# Altium PCB MainBoardPCB_4.PcbDoc (part 5 of 32)
Units mm, origin at the board's own origin, x right, y up, seen from the top; angles counter-clockwise.
Board outline 333.63 x 349.38 mm, 16 copper layers (L1, L2 (GND), L3 (Sign), L4 (GND), L5 (Sign), L6 (PWR/GND), L7(PWR/GND), L8 (Plane_GND), L9 (PWR/GND), L10 (PWR/GND), L11 (PWR/GND), L12 (Sign), L13 (GND), L14 (Sign), L15 (GND), L16), stack 2.502 mm thick; 2205 components, 1648 nets, 8314 pads, 3172 vias.
Unrouted connection lines stored in the file: 5141.
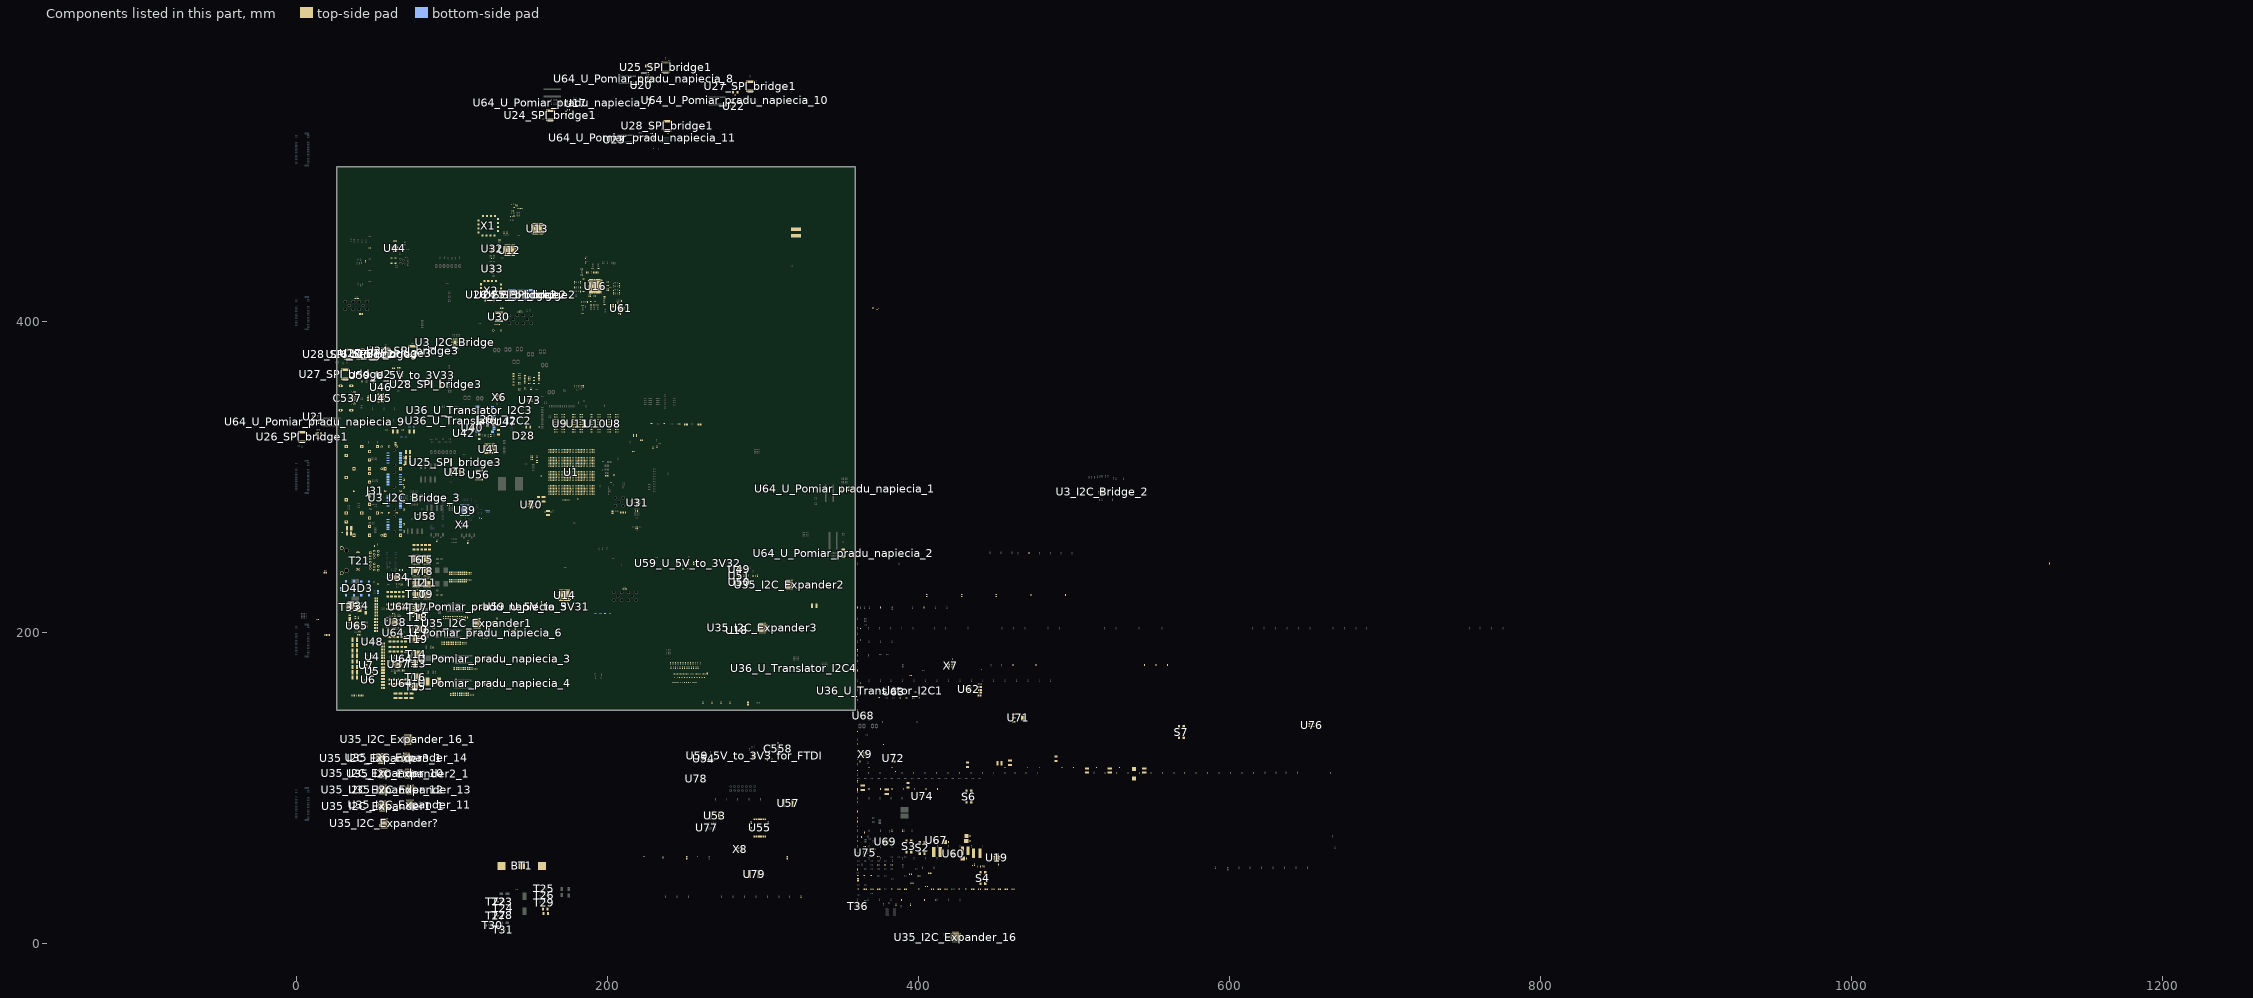
[diagram p17: the components of this part, seen from the top]

## Components (designator, comment, footprint, x,y, rotation, side; value= is the part's Value field where it differs from the comment) (continued)
T5 "BSC080N03LSG" BSC080N03LS 83.977,246.623 r90 top
T6 "BSC080N03LSG" BSC080N03LS 76.977,246.623 r90 top locked
T7 "BSC030N03LS-G" BSC030N03LS 76.977,239.389 r90 top
T8 "BSC030N03LS-G" BSC030N03LS 83.977,239.389 r90 top
T9 "BSC080N03LSG" BSC080N03LS 83.977,224.601 r270 top
T10 "BSC080N03LSG" BSC080N03LS 76.983,224.601 r270 top
T11 "BSC030N03LS-G" BSC030N03LS 83.977,231.864 r270 top
T12 "BSC030N03LS-G" BSC030N03LS 76.977,231.864 r270 top
T13 "BSC080N03LSG" BSC080N03LS 77.142,179.908 r180 top
T14 "BSC030N03LS-G" BSC030N03LS 77.114,186.055 r0 top
T15 "BSC080N03LSG" BSC080N03LS 76.889,165.106 r180 top
T16 "BSC030N03LS-G" BSC030N03LS 76.91,171.285 r0 top
T17 "BSC080N03LSG" BSC080N03LS 78.098,215.984 r180 top
T18 "BSC030N03LS-G" BSC030N03LS 78.073,209.702 r0 top
T19 "BSC080N03LSG" BSC080N03LS 78.029,195.651 r180 top
T20 "BSC030N03LS-G" BSC030N03LS 77.974,202.057 r0 top
T21 "7499511440" 7499511440 37.922,246.126 r90 bottom
T22 "IRLML6401TRPBF" IRLML6401PbF 128.638,26.733 r0 top
T23 "IRLML6401TRPBF" IRLML6401PbF 132.715,26.81 r0 top
T24 "SI2342DS-T1-GE3" SI2342DS-T1-GE3 132.905,22.581 r0 top
T25 "SI2342DS-T1-GE3" SI2342DS-T1-GE3 159.55,35.065 r0 top
T26 "SI2342DS-T1-GE3" SI2342DS-T1-GE3 159.461,30.836 r0 top
T27 "IRLML6401TRPBF" IRLML6401PbF 128.524,17.818 r0 top
T28 "SI2342DS-T1-GE3" SI2342DS-T1-GE3 132.601,18.212 r0 top
T29 "SI2342DS-T1-GE3" SI2342DS-T1-GE3 159.55,26.2 r0 top
T30 "IRLML6401TRPBF" IRLML6401PbF 126.263,11.532 r0 top
T31 "SI2342DS-T1-GE3" SI2342DS-T1-GE3 133.096,8.801 r0 top
T34 "RJK0651DPB-00#J5" RJK0651DPB 40.282,216.141 r270 top
T35 "SIJ482DP-T1-GE3" SiJ482DP 34.455,216.179 r90 top
T36 "SI2342DS-T1-GE3" SI2342DS-T1-GE3 361.423,24.028 r0 top
TP1_I2C_Bridge "TestPoint" TestPoint 766.635,73.393 r90 top (schematic designator TP1)
TP1_I2C_Bridge_2 "TestPoint" TestPoint 1231.379,242.418 r90 top (schematic designator TP1)
TP1_I2C_Bridge_3 "TestPoint" TestPoint 775.271,83.629 r90 top (schematic designator TP1)
TP2_I2C_Bridge "TestPoint" TestPoint 743.534,73.393 r90 top (schematic designator TP2)
TP2_I2C_Bridge_2 "TestPoint" TestPoint 1206.233,242.418 r90 top (schematic designator TP2)
TP2_I2C_Bridge_3 "TestPoint" TestPoint 751.662,83.629 r90 top (schematic designator TP2)
TP3_I2C_Bridge "TestPoint" TestPoint 720.42,73.393 r90 top (schematic designator TP3)
TP3_I2C_Bridge_2 "TestPoint" TestPoint 1181.1,242.418 r90 top (schematic designator TP3)
TP3_I2C_Bridge_3 "TestPoint" TestPoint 728.04,83.629 r90 top (schematic designator TP3)
TP4_I2C_Bridge "TestPoint" TestPoint 697.319,73.393 r90 top (schematic designator TP4)
TP4_I2C_Bridge_2 "TestPoint" TestPoint 1155.967,242.418 r90 top (schematic designator TP4)
TP4_I2C_Bridge_3 "TestPoint" TestPoint 704.418,83.629 r90 top (schematic designator TP4)
TP5_I2C_Bridge "TestPoint" TestPoint 674.205,73.393 r90 top (schematic designator TP5)
TP5_I2C_Bridge_2 "TestPoint" TestPoint 1104.151,242.418 r90 top (schematic designator TP5)
TP5_I2C_Bridge_3 "TestPoint" TestPoint 680.809,83.629 r90 top (schematic designator TP5)
TP6_I2C_Bridge "TestPoint" TestPoint 651.104,73.393 r90 top (schematic designator TP6)
TP6_I2C_Bridge_2 "TestPoint" TestPoint 1079.017,242.418 r90 top (schematic designator TP6)
TP6_I2C_Bridge_3 "TestPoint" TestPoint 657.187,83.629 r90 top (schematic designator TP6)
TP7_I2C_Bridge_2 "TestPoint" TestPoint 898.22,242.418 r90 top (schematic designator TP7)
TP8_I2C_Bridge "TestPoint" TestPoint 627.99,73.393 r90 top (schematic designator TP8)
TP8_I2C_Bridge_2 "TestPoint" TestPoint 1053.871,242.418 r90 top (schematic designator TP8)
TP8_I2C_Bridge_3 "TestPoint" TestPoint 633.578,83.629 r90 top (schematic designator TP8)
TP9_I2C_Bridge "TestPoint" TestPoint 604.888,73.393 r90 top (schematic designator TP9)
TP9_I2C_Bridge_2 "TestPoint" TestPoint 1028.738,242.418 r90 top (schematic designator TP9)
TP9_I2C_Bridge_3 "TestPoint" TestPoint 609.956,83.629 r90 top (schematic designator TP9)
TP10_I2C_Bridge "TestPoint" TestPoint 580.504,73.393 r90 top (schematic designator TP10)
TP10_I2C_Bridge_2 "TestPoint" TestPoint 1002.322,242.418 r90 top (schematic designator TP10)
TP10_I2C_Bridge_3 "TestPoint" TestPoint 585.076,83.629 r90 top (schematic designator TP10)
TP11_I2C_Bridge "TestPoint" TestPoint 556.387,73.393 r90 top (schematic designator TP11)
TP11_I2C_Bridge_2 "TestPoint" TestPoint 976.173,242.418 r90 top (schematic designator TP11)
TP11_I2C_Bridge_3 "TestPoint" TestPoint 560.438,83.629 r90 top (schematic designator TP11)
TP12_I2C_Bridge_2 "TestPoint" TestPoint 949.769,242.418 r90 top (schematic designator TP12)
TP13_I2C_Bridge_2 "TestPoint" TestPoint 923.353,242.418 r90 top (schematic designator TP13)
TP14_I2C_Bridge_2 "TestPoint" TestPoint 871.804,242.418 r90 top (schematic designator TP14)
TP15_I2C_Bridge "TestPoint" TestPoint 387.007,232.181 r90 top (schematic designator TP15)
TP15_I2C_Bridge_2 "TestPoint" TestPoint 845.401,242.418 r90 top (schematic designator TP15)
TP15_I2C_Bridge_3 "TestPoint" TestPoint 362.636,74.905 r90 top (schematic designator TP15)
TP16_I2C_Bridge "TestPoint" TestPoint 362.636,232.181 r90 top (schematic designator TP16)
TP16_I2C_Bridge_2 "TestPoint" TestPoint 818.985,242.418 r90 top (schematic designator TP16)
TP16_I2C_Bridge_3 "TestPoint" TestPoint 521.818,103.632 r90 top (schematic designator TP16)
TP17_I2C_Bridge "TestPoint" TestPoint 387.007,64.668 r90 top (schematic designator TP17)
TP17_I2C_Bridge_2 "TestPoint" TestPoint 792.582,242.418 r90 top (schematic designator TP17)
TP17_I2C_Bridge_3 "TestPoint" TestPoint 500.431,105.664 r90 top (schematic designator TP17)
TP18_I2C_Bridge "TestPoint" TestPoint 379.324,59.372 r90 top (schematic designator TP18)
TP18_I2C_Bridge_2 "TestPoint" TestPoint 766.166,242.418 r90 top (schematic designator TP18)
TP18_I2C_Bridge_3 "TestPoint" TestPoint 506.4,116.599 r90 top (schematic designator TP18)
TP19 "TestPoint" TestPoint 371.297,22.606 r0 top
TP20 "TestPoint" TestPoint 365.925,19.431 r0 top
TP33 "TestPoint" TestPoint 441.947,64.834 r0 top
TP34 "TestPoint" TestPoint 661.441,201.346 r0 top
TP35 "TestPoint" TestPoint 609.879,201.346 r0 top
TP36 "TestPoint" TestPoint 551.447,201.346 r0 top
TP37 "TestPoint" TestPoint 536.715,201.346 r0 top
TP38 "TestPoint" TestPoint 478.282,201.346 r0 top
TP39 "TestPoint" TestPoint 448.818,201.346 r0 top
TP40 "TestPoint" TestPoint 441.452,201.346 r0 top
TP41 "TestPoint" TestPoint 427.152,201.346 r0 top
TP42 "TestPoint" TestPoint 405.308,201.346 r0 top
TP43 "TestPoint" TestPoint 436.791,192.621 r0 top
TP44 "TestPoint" TestPoint 429.425,192.621 r0 top
TP45 "TestPoint" TestPoint 422.059,192.621 r0 top
TP46 "TestPoint" TestPoint 414.706,192.621 r0 top
TP47 "TestPoint" TestPoint 407.34,192.621 r0 top
TP48 "TestPoint" TestPoint 399.974,192.621 r0 top
TP49 "TestPoint" TestPoint 392.608,192.621 r0 top
TP50_SPI_bridge2 "TestPoint" TestPoint 239.789,400.736 r0 top (schematic designator TP50)
TP50_SPI_bridge3 "TestPoint" TestPoint 513.207,104.102 r90 top (schematic designator TP50)
TP51_SPI_bridge2 "TestPoint" TestPoint 235.217,390.855 r0 top (schematic designator TP51)
TP51_SPI_bridge3 "TestPoint" TestPoint 488.328,104.102 r90 top (schematic designator TP51)
TP52_SPI_bridge2 "TestPoint" TestPoint 240.805,395.199 r0 top (schematic designator TP52)
TP52_SPI_bridge3 "TestPoint" TestPoint 463.182,104.102 r90 top (schematic designator TP52)
TP53_SPI_bridge1 "TestPoint" TestPoint 436.524,351.409 r90 top (schematic designator TP53)
TP53_SPI_bridge2 "TestPoint" TestPoint 231.318,402.933 r0 top (schematic designator TP53)
TP53_SPI_bridge3 "TestPoint" TestPoint 438.048,104.102 r90 top (schematic designator TP53)
TP54_SPI_bridge2 "TestPoint" TestPoint 238.938,408.292 r0 top (schematic designator TP54)
TP55_SPI_bridge2 "TestPoint" TestPoint 250.114,409.873 r0 top (schematic designator TP55)
TP56_SPI_bridge1 "TestPoint" TestPoint 411.899,351.409 r90 top (schematic designator TP56)
TP56_SPI_bridge2 "TestPoint" TestPoint 247.688,404.228 r0 top (schematic designator TP56)
TP56_SPI_bridge3 "TestPoint" TestPoint 412.915,361.645 r90 top (schematic designator TP56)
TP57_SPI_bridge1 "TestPoint" TestPoint 387.261,351.409 r90 top (schematic designator TP57)
TP57_SPI_bridge2 "TestPoint" TestPoint 256.083,410.096 r0 top (schematic designator TP57)
TP57_SPI_bridge3 "TestPoint" TestPoint 387.769,361.645 r90 top (schematic designator TP57)
TP58_SPI_bridge1 "TestPoint" TestPoint 417.716,94.221 r90 top (schematic designator TP58)
TP58_SPI_bridge2 "TestPoint" TestPoint 247.282,398.082 r0 top (schematic designator TP58)
TP58_SPI_bridge3 "TestPoint" TestPoint 387.769,95.377 r90 top (schematic designator TP58)
TP59_SPI_bridge1 "TestPoint" TestPoint 362.636,351.409 r90 top (schematic designator TP59)
TP59_SPI_bridge2 "TestPoint" TestPoint 254.734,404 r0 top (schematic designator TP59)
TP59_SPI_bridge3 "TestPoint" TestPoint 362.636,361.645 r90 top (schematic designator TP59)
TP60_U_Translator_I2C1 "TestPoint" TestPoint 253.441,398.64 r0 top (schematic designator TP60)
TP60_U_Translator_I2C2 "TestPoint" TestPoint 396.733,117.5 r90 top (schematic designator TP60)
TP60_U_Translator_I2C3 "TestPoint" TestPoint 262.179,409.651 r0 top (schematic designator TP60)
TP60_U_Translator_I2C4 "TestPoint" TestPoint 258.966,398.031 r0 top (schematic designator TP60)
TP61_U_Translator_I2C1 "TestPoint" TestPoint 231.546,408.013 r0 top (schematic designator TP61)
TP61_U_Translator_I2C2 "TestPoint" TestPoint 362.636,371.881 r90 top (schematic designator TP61)
TP61_U_Translator_I2C3 "TestPoint" TestPoint 240.182,388.887 r0 top (schematic designator TP61)
TP61_U_Translator_I2C4 "TestPoint" TestPoint 231.61,398.196 r0 top (schematic designator TP61)
TP62 "TestPoint" TestPoint 539.001,29.273 r0 top
TP63 "TestPoint" TestPoint 531.635,29.273 r0 top
TP64 "TestPoint" TestPoint 524.281,29.273 r0 top
TP65 "TestPoint" TestPoint 516.915,29.273 r0 top
TP66 "TestPoint" TestPoint 509.549,29.273 r0 top
TP67 "TestPoint" TestPoint 502.183,29.273 r0 top
TP68 "TestPoint" TestPoint 494.817,29.273 r0 top
TP69 "TestPoint" TestPoint 487.451,29.273 r0 top
TP70 "TestPoint" TestPoint 480.085,29.273 r0 top
TP71 "TestPoint" TestPoint 473.164,29.273 r0 top
TP72 "TestPoint" TestPoint 465.798,29.273 r0 top
TP73 "TestPoint" TestPoint 473.164,37.998 r0 top
TP74 "TestPoint" TestPoint 465.798,37.998 r0 top
TP75 "TestPoint" TestPoint 458.432,29.273 r0 top
TP76 "TestPoint" TestPoint 451.066,29.273 r0 top
TP77 "TestPoint" TestPoint 443.713,29.273 r0 top
TP78 "TestPoint" TestPoint 436.347,29.273 r0 top
TP79 "TestPoint" TestPoint 428.981,29.273 r0 top
TP80 "TestPoint" TestPoint 421.615,29.273 r0 top
TP81 "TestPoint" TestPoint 414.693,29.273 r0 top
TP82 "TestPoint" TestPoint 408.648,29.489 r0 top
TP83 "TestPoint" TestPoint 399.961,29.273 r0 top
TP84 "TestPoint" TestPoint 392.595,29.273 r0 top
TP85 "TestPoint" TestPoint 385.229,29.273 r0 top
TP86 "TestPoint" TestPoint 377.863,29.273 r0 top
TP87 "TestPoint" TestPoint 370.802,28.854 r0 top
TP88 "TestPoint" TestPoint 402.272,19.914 r0 top
TP91 "TestPoint" TestPoint 370.497,151.397 r0 top
TP92 "TestPoint" TestPoint 363.131,151.397 r0 top
U1 "FBVB900" "FBVB900 XX" 176.897,303.039 r90 top locked
U3_I2C_Bridge "TCA9548" TCA9548 102.07,386.613 r90 top (schematic designator U3)
U3_I2C_Bridge_2 "TCA9548" TCA9548 518.223,290.373 r90 top (schematic designator U3)
U3_I2C_Bridge_3 "TCA9548" TCA9548 75.769,286.567 r90 top (schematic designator U3)
U4 "TPS2121RUXT" TPS212x 48.71,184.321 r270 top
U5 "TPS2121RUXT" TPS212x 48.71,175 r270 top
U6 "FPF2895CUCX" FPF2895C-D 46.21,169.389 r90 top
U7 "FPF2895CUCX" FPF2895C-D 45.075,178.775 r0 top
U8 "MT40A512M16JY" MT40A512M16JY 203.657,334.06 r180 top locked
U9 "MT40A512M16JY" MT40A512M16JY 169.276,334.06 r180 top locked
U10 "MT40A512M16JY" MT40A512M16JY 192.197,334.06 r180 top locked
U11 "MT40A512M16JY" MT40A512M16JY 180.736,334.06 r180 top locked
U12 "LTC6952" LTC6952 137.046,445.63 r90 top
U13 "LTC6952" LTC6952 155.05,459.542 r90 top
U14 "LTC6952" LTC6952 172.476,223.926 r90 top
U15 "SN74AXC4T774PWR" SN74AXC4T774PWR 41.295,378.993 r90 top
U16 "LMK05028" LMK05028 192.24,422.516 r90 top
U17 "FPF2895CUCX" FPF2895C-D 179.528,540.397 r0 top
U18 "FPF2895CUCX" FPF2895C-D 283.346,201.393 r0 top
U19 "LT3504EUFD#PBF" LT3504 450.431,55.143 r0 top
U20 "FPF2895CUCX" FPF2895C-D 221.847,551.77 r270 top
U21 "FPF2895CUCX" FPF2895C-D 11.167,338.579 r270 top
U22 "FPF2895CUCX" FPF2895C-D 281.268,538.267 r90 top
U23 "FPF2895CUCX" FPF2895C-D 204.448,516.817 r0 top
U24_SPI_bridge1 "SN74AXC4T774PWR" SN74AXC4T774PWR 163.18,532.555 r270 top (schematic designator U24)
U24_SPI_bridge2 "SN74AXC4T774PWR" SN74AXC4T774PWR 144.322,416.997 r90 bottom (schematic designator U24)
U24_SPI_bridge3 "SN74AXC4T774PWR" SN74AXC4T774PWR 74.765,381.025 r90 top (schematic designator U24)
U25_SPI_bridge1 "SN74AXC4T774PWR" SN74AXC4T774PWR 237.53,563.508 r90 top (schematic designator U25)
U25_SPI_bridge2 "SN74AXC4T774PWR" SN74AXC4T774PWR 149.974,416.997 r90 bottom (schematic designator U25)
U25_SPI_bridge3 "SN74AXC4T774PWR" SN74AXC4T774PWR 102.324,309.27 r180 top (schematic designator U25)
U26_SPI_bridge1 "SN74AXC4T774PWR" SN74AXC4T774PWR 3.716,325.679 r270 top (schematic designator U26)
U26_SPI_bridge2 "SN74AXC4T774PWR" SN74AXC4T774PWR 138.671,416.997 r90 bottom (schematic designator U26)
U26_SPI_bridge3 "SN74AXC4T774PWR" SN74AXC4T774PWR 48.984,378.739 r90 top (schematic designator U26)
U27_SPI_bridge1 "SN74AXC4T774PWR" SN74AXC4T774PWR 291.77,551.129 r90 top (schematic designator U27)
U27_SPI_bridge2 "SN74AXC4T774PWR" SN74AXC4T774PWR 31.342,365.912 r90 top (schematic designator U27)
U27_SPI_bridge3 "SN74AXC4T774PWR" SN74AXC4T774PWR 57.366,379.501 r90 top (schematic designator U27)
U28_SPI_bridge1 "SN74AXC4T774PWR" SN74AXC4T774PWR 238.684,525.78 r270 top (schematic designator U28)
U28_SPI_bridge2 "SN74AXC4T774PWR" SN74AXC4T774PWR 33.617,378.739 r90 top (schematic designator U28)
U28_SPI_bridge3 "SN74AXC4T774PWR" SN74AXC4T774PWR 89.624,359.435 r180 top (schematic designator U28)
U30 "DAC1220" DAC1220 130.289,402.9 r90 top
U31 "SI53323-B-GM" SI53323-B-GM 219.267,283.493 r270 top
U32 "SI53323-B-GM" SI53323-B-GM 125.971,446.548 r0 top
U33 "CDCM1802RGTT" CDCM1802RGTT 126.102,433.764 r90 top
U34 "ADP1850ACPZ-R7" ADP1850 65.072,235.389 r0 top
U35_I2C_Expander1 "MCP23017-E/ML" QFN-ML28_N 116.167,205.864 r0 top (schematic designator U35)
U35_I2C_Expander1_1 "MCP23017-E/ML" QFN-ML28_N 55.761,88.333 r90 top (schematic designator U35)
U35_I2C_Expander2 "MCP23017-E/ML" QFN-ML28_N 316.954,230.657 r90 top (schematic designator U35)
U35_I2C_Expander2_1 "MCP23017-E/ML" QFN-ML28_N 72.04,109.182 r90 top (schematic designator U35)
U35_I2C_Expander3 "MCP23017-E/ML" QFN-ML28_N 299.575,202.813 r90 top (schematic designator U35)
U35_I2C_Expander3_1 "MCP23017-E/ML" QFN-ML28_N 54.721,118.886 r90 top (schematic designator U35)
U35_I2C_Expander? "MCP23017-E/ML" QFN-ML28_N 56.421,77.163 r90 top (schematic designator U35)
U35_I2C_Expander_10 "MCP23017-E/ML" QFN-ML28_N 55.646,109.332 r90 top (schematic designator U35)
U35_I2C_Expander_11 "MCP23017-E/ML" QFN-ML28_N 73.005,89.078 r90 top (schematic designator U35)
U35_I2C_Expander_12 "MCP23017-E/ML" QFN-ML28_N 55.646,98.666 r90 top (schematic designator U35)
U35_I2C_Expander_13 "MCP23017-E/ML" QFN-ML28_N 73.292,98.666 r90 top (schematic designator U35)
U35_I2C_Expander_14 "MCP23017-E/ML" QFN-ML28_N 70.942,119.263 r90 top (schematic designator U35)
U35_I2C_Expander_16 "MCP23017-E/ML" QFN-ML28_N 424.072,4.1 r90 top (schematic designator U35)
U35_I2C_Expander_16_1 "MCP23017-E/ML" QFN-ML28_N 71.728,131.106 r90 top (schematic designator U35)
U36_U_Translator_I2C1 "PCA9306" PCA9306 375.158,162.56 r90 top (schematic designator U36)
U36_U_Translator_I2C2 "PCA9306" PCA9306 110.627,335.941 r0 top (schematic designator U36)
U36_U_Translator_I2C3 "PCA9306" PCA9306 111.214,342.671 r90 top (schematic designator U36)
U36_U_Translator_I2C4 "PCA9306" PCA9306 319.885,176.957 r90 top (schematic designator U36)
U37 "ADP1850ACPZ-R7" ADP1850 65.425,179.567 r0 top
U38 "ADP1850ACPZ-R7" ADP1850 63.703,206.464 r0 top
U39 "DP83867ERGZT" DP83867E 108.299,278.525 r0 bottom
U40 "MCP1727T-ADJE/MF" MCP1727T-ADJE/MF 113.17,331.521 r0 top
U41 "MTFC8GAKAJCN-4MITTR" "MTFC8GAKAJCN-4M IT TR" 124.188,317.841 r270 top locked
U42 "MCP1727T-ADJE/MF" MCP1727T-ADJE/MF 107.539,328.046 r0 top
U43 "SN74AXC4T774PWR" SN74AXC4T774PWR 102.324,303.047 r180 top
U44 "MAX16025TE+T" MAX16025TE+T 63.42,446.853 r0 top
U45 "USB3320C-EZK-TR" USB3320 54.331,350.685 r0 top
U46 "FPF2895CUCX" FPF2895C-D 54.445,357.645 r0 top
U47 "IP4856CX25/CZ" IP4856CX25/C 134.729,335.404 r180 bottom locked
U48 "TPS2121RUXT" TPS212x 48.677,193.983 r270 top
U49 "MCP1727T-ADJE/MF" MCP1727T-ADJE/MF 284.958,240.682 r0 top
U50 "MCP1727T-ADJE/MF" MCP1727T-ADJE/MF 284.831,232.104 r0 top
U51 "MCP1727T-ADJE/MF" MCP1727T-ADJE/MF 284.958,236.364 r0 top
U53 "SN74AXC4T774PWR" SN74AXC4T774PWR 269.029,82.182 r0 top
U54 "93LC56BT-I/OT" 93LC56BT 261.971,118.631 r0 top
U55 "FT4232HL-REEL" FT4232HL 297.904,74.295 r0 top
U56 "SN74AXC4T774PWR" SN74AXC4T774PWR 117.335,301.231 r270 top
U57 "SN74AXC4T774PWR" SN74AXC4T774PWR 316.179,90.183 r0 top
U58 "ISM330DHCXTR" ISM330DHCXL 83.007,274.777 r0 top
U59_5V_to_3V3_for_FTDI "MCP1727T-ADJE/MF" MCP1727T-ADJE/MF 294.348,120.688 r90 top (schematic designator U59)
U59_U_5V_to_3V31 "MCP1727T-ADJE/MF" MCP1727T-ADJE/MF 154.362,216.491 r0 top (schematic designator U59)
U59_U_5V_to_3V32 "MCP1727T-ADJE/MF" MCP1727T-ADJE/MF 251.841,244.386 r180 top (schematic designator U59)
U59_U_5V_to_3V33 "MCP1727T-ADJE/MF" MCP1727T-ADJE/MF 67.78,365.404 r0 top (schematic designator U59)
U60 "ADP1741ACPZ-R7" ADP1752_1753/ADP1740_1741 422.354,57.672 r0 top
U61 "TPS7A8801RTJT" TPS7A88 208.496,408.446 r180 top
U62 "LT3042EDD#PBF" LT3042 432.308,163.576 r0 top
U63 "MAX3051EKA+T" "MAX3051EKA+T SOT23" 384.289,161.823 r0 top
U64_U_Pomiar_pradu_napiecia_1 "INA226AIDGSR" INA226 352.727,292.236 r0 top (schematic designator U64)
U64_U_Pomiar_pradu_napiecia_2 "INA226AIDGSR" INA226 351.752,250.85 r90 top (schematic designator U64)
U64_U_Pomiar_pradu_napiecia_3 "INA226AIDGSR" INA226 118.478,183.159 r180 top (schematic designator U64)
U64_U_Pomiar_pradu_napiecia_4 "INA226AIDGSR" INA226 118.681,167.127 r180 top (schematic designator U64)
U64_U_Pomiar_pradu_napiecia_5 "INA226AIDGSR" INA226 116.548,216.393 r180 top (schematic designator U64)
U64_U_Pomiar_pradu_napiecia_6 "INA226AIDGSR" INA226 113.005,199.771 r180 top (schematic designator U64)
U64_U_Pomiar_pradu_napiecia_7 "INA226AIDGSR" INA226 171.775,540.697 r0 top (schematic designator U64)
U64_U_Pomiar_pradu_napiecia_8 "INA226AIDGSR" INA226 223.444,556.142 r180 top (schematic designator U64)
U64_U_Pomiar_pradu_napiecia_9 "INA226AIDGSR" INA226 12.002,335.331 r0 top (schematic designator U64)
U64_U_Pomiar_pradu_napiecia_10 "INA226AIDGSR" INA226 281.823,542.12 r180 top (schematic designator U64)
U64_U_Pomiar_pradu_napiecia_11 "INA226AIDGSR" INA226 222.428,518.16 r180 top (schematic designator U64)
U65 "MAX17557ATP+" MAX17557 38.76,204.318 r90 top
U67 "LM3880MFE-1AF/NOPB" LM3880-Q1 411.353,66.332 r0 top
U68 "LM3880MFE-1AF/NOPB" LM3880-Q1 364.426,146.444 r0 top
U69 "ADP1741ACPZ-R7" ADP1752_1753/ADP1740_1741 378.732,65.251 r0 top
U70 "TPS7A8801RTJT" TPS7A88 150.914,282.003 r0 top
U71 "UA78M08CDCYR" UA78M 464.337,144.958 r0 top
U72 "INA226AIDGSR" INA226 383.997,119.189 r90 top
U73 "ST1L08SPUR" ST1L08 150.244,349.234 r0 top
U74 "SN74LVC1G08DBVR" SN74LVC1G08DBVR 402.488,94.602 r0 top
U75 "ESDCAN02-2BWY" ESDCAN02-2BWY 365.852,58.141 r0 top
U76 "SN74LVC1G08DBVR" SN74LVC1G08DBVR 652.831,140.335 r0 top
U77 "NC7WZ07FHX" NC7WZ07FHX 263.949,74.317 r90 top
U78 "NC7WZ07FHX" NC7WZ07FHX 257.238,105.88 r90 top
U79 "SN74AXC4T774PWR" SN74AXC4T774PWR 294.373,44.602 r0 top
X1 "OSC CRO 2000-2000 MHZ SMD .5X.5" CVCO55CW 117.081,455.097 r0 top
X2 "OSC VCO 490-540MHZ SMD .5X.5\"" CVCO55CW 131.559,413.314 r90 top
X3 "2.4576MHz" Crystal 131.613,394.137 r180 top
X4 "FA-23825.0000MB-C3" FA-23825.0000MB-C3 107.086,269.076 r180 bottom
X5 "32.768kHz" FC-135R/FC-135 149.073,332.105 r0 top
X6 "510CCA50M0000BAG" Si510 130.504,351.091 r270 top
X7 "TSX-322524.0000MF15X-AC6" "TSX-3225 24.0000MF15X-AC6" 420.789,178.498 r0 top
X8 "ECS-120-8-33-RWY-TR" ECS-120-8-33-RWY-TR 285.42,60.389 r0 top
X9 "SIT1602BI-12-33E-48.000000G" SiT1602B 365.762,121.718 r0 top

## Footprints (in the part's own frame and the unit in brackets; to place one, negate y for a bottom-side part, rotate by r counter-clockwise, add the part's x,y. Pads: shape width x height; smd on the part's side, far side on the other; paste and mask are expansions set on the pad)
93LC56BT [mm] "SOT-23-6, 6-Leads, Body 2,90x1,55mm, Pitch 0,95mm, IPC High Density"
  rect 1.1x0.6 smd: 1(-1.4,0.95) 2(-1.4,0) 3(-1.4,-0.95) 4(1.4,-0.95) 5(1.4,0) 6(1.4,0.95)
  silkscreen extent -1.52,-1.55 0.5,1.92, body extent -1.35,-1.55 1.35,1.55, height 1.45
2007132 [mm] "SFP Connector"
  rect 0.5x2 smd: 1(3.725,21.8) 2(4.525,21.8) 3(5.325,21.8) 4(6.125,21.8) 5(6.925,21.8) 6(7.725,21.8) 7(8.525,21.8) 8(9.325,21.8) 9(10.125,21.8) 10(10.925,21.8) 11(10.525,30) 12(9.725,30) 13(8.925,30) 14(8.125,30) 15(7.325,30) 16(6.525,30) 17(5.725,30) 18(4.925,30) 19(4.125,30) 20(3.325,30) 21(17.975,21.8) 22(18.775,21.8) 23(19.575,21.8) 24(20.375,21.8) 25(21.175,21.8) 26(21.975,21.8) 27(22.775,21.8) 28(23.575,21.8) 29(24.375,21.8) 30(25.175,21.8) 31(24.775,30) 32(23.975,30) 33(23.175,30) 34(22.375,30) 35(21.575,30) 36(20.775,30) 37(19.975,30) 38(19.175,30) 39(18.375,30) 40(17.565,29.997) 41(32.225,21.8) 42(33.025,21.8) 43(33.825,21.8) 44(34.625,21.8) 45(35.425,21.8) 46(36.225,21.8) 47(37.025,21.8) 48(37.825,21.8) 49(38.625,21.8) 50(39.425,21.8) 51(39.025,30) 52(38.225,30) 53(37.425,30) 54(36.625,30) 55(35.825,30) 56(35.025,30) 57(34.225,30) 58(33.425,30) 59(32.625,30) 60(31.825,30) 61(46.475,21.8) 62(47.275,21.8) 63(48.075,21.8) 64(48.875,21.8) 65(49.675,21.8) 66(50.475,21.8) 67(51.275,21.8) 68(52.075,21.8) 69(52.875,21.8) 70(53.675,21.8) 71(53.275,30) 72(52.475,30) 73(51.675,30) 74(50.875,30) 75(50.075,30) 76(49.275,30) 77(48.475,30) 78(47.675,30) 79(46.875,30) 80(46.075,30)
  rect 2x2 hole 1.05: SH1(0,0) SH2(8.575,-5) SH3(14.25,-5) SH4(0,10) SH5(5.675,10) SH6(11.075,10) SH7(14.25,15) SH8(0,20) SH9(0,30) SH10(14.25,5) SH13(19.925,10) SH14(25.325,10) SH17(22.825,-5) SH20(34.175,10) SH21(39.575,10) SH22(42.75,10) SH23(42.75,0) SH24(37.075,-5) SH25(42.75,20) SH26(42.75,30) SH29(57,15) SH30(57,5) SH31(57,-5) SH32(48.425,10) SH33(53.825,10) SH34(51.325,-5)
  round 1.458 hole 0.95: SH11(14.25,22.5) SH12(14.25,27.5) SH15(28.5,10) SH16(28.5,0) SH18(28.5,20) SH19(28.5,30) SH27(57,27.5) SH28(57,22.5) SH35(0,17.8) SH36(2.325,32.1) SH37(7.125,32.1) SH38(14.25,17.8) SH39(16.575,32.1) SH40(21.375,32.1) SH41(30.825,32.1) SH42(35.625,32.1) SH43(45.075,32.1) SH44(49.875,32.1) SH45(42.75,17.8) SH46(57,17.8)
  round 1.55 hole 1.55: ""(2.325,25.9) ""(16.575,25.9) ""(26.175,25.9) ""(30.825,25.9) ""(40.425,25.9) ""(45.075,25.9) ""(54.675,25.9)
  round 1.55 hole 1.55 unplated: ""(11.925,25.9)
  Keep-Out Layer region: -1.001,17.3 58,17.3 58,-9.514 -1.001,-9.514
  Keep-Out Layer region: 13.255,31.8 15.25,31.8 15.25,17.306 13.255,17.306
  Keep-Out Layer region: 27.544,31.8 29.5,31.8 29.5,17.328 27.544,17.328
  Keep-Out Layer region: 41.817,31.8 43.75,31.8 43.75,17.328 41.817,17.328
  Keep-Out Layer region: -1.002,31.8 1,31.8 1,17.334 -1.002,17.334
  Keep-Out Layer region: 56.018,31.8 58,31.8 58,17.305 56.018,17.305
  Keep-Out Layer region: -1.001,32.8 3.305,32.8 3.305,31.833 -1.001,31.833
  Keep-Out Layer region: 53.775,32.8 58,32.8 58,31.848 53.775,31.848
  Keep-Out Layer region: 11.207,32.8 17.31,32.8 17.31,31.849 11.207,31.849
  Keep-Out Layer region: 25.472,32.8 31.56,32.8 31.56,31.84 25.472,31.84
  Keep-Out Layer region: 39.72,32.8 45.81,32.8 45.81,31.824 39.72,31.824
  Keep-Out Layer region: -1.002,17.3 58,17.3 58,-9.517 -1.002,-9.517
  Keep-Out Layer region: 13.269,31.8 15.25,31.8 15.25,17.324 13.269,17.324
  Keep-Out Layer region: 27.554,31.8 29.5,31.8 29.5,17.334 27.554,17.334
  Keep-Out Layer region: 41.815,31.8 43.75,31.8 43.75,17.327 41.815,17.327
  Keep-Out Layer region: -1.002,31.8 1,31.8 1,17.328 -1.002,17.328
  Keep-Out Layer region: 56.056,31.8 58,31.8 58,17.317 56.056,17.317
  Keep-Out Layer region: -1,32.8 3.305,32.8 3.305,31.812 -1,31.812
  Keep-Out Layer region: 53.789,32.8 58,32.8 58,31.855 53.789,31.855
  Keep-Out Layer region: 11.205,32.8 17.31,32.8 17.31,31.843 11.205,31.843
  Keep-Out Layer region: 25.485,32.8 31.56,32.8 31.56,31.857 25.485,31.857
  Keep-Out Layer region: 39.745,32.8 45.81,32.8 45.81,31.844 39.745,31.844
  Keep-Out Layer region: -1.001,17.3 58,17.3 58,-9.514 -1.001,-9.514
  Keep-Out Layer region: 13.255,31.8 15.25,31.8 15.25,17.306 13.255,17.306
  Keep-Out Layer region: 27.544,31.8 29.5,31.8 29.5,17.328 27.544,17.328
  Keep-Out Layer region: 41.817,31.8 43.75,31.8 43.75,17.328 41.817,17.328
  Keep-Out Layer region: -1.002,31.8 1,31.8 1,17.334 -1.002,17.334
  Keep-Out Layer region: 56.018,31.8 58,31.8 58,17.305 56.018,17.305
  Keep-Out Layer region: -1.001,32.8 3.305,32.8 3.305,31.833 -1.001,31.833
  Keep-Out Layer region: 53.775,32.8 58,32.8 58,31.848 53.775,31.848
  Keep-Out Layer region: 11.207,32.8 17.31,32.8 17.31,31.849 11.207,31.849
  Keep-Out Layer region: 25.472,32.8 31.56,32.8 31.56,31.84 25.472,31.84
  Keep-Out Layer region: 39.72,32.8 45.81,32.8 45.81,31.824 39.72,31.824
  Keep-Out Layer region: -1.002,17.3 58,17.3 58,-9.517 -1.002,-9.517
  Keep-Out Layer region: 13.269,31.8 15.25,31.8 15.25,17.324 13.269,17.324
  Keep-Out Layer region: 27.554,31.8 29.5,31.8 29.5,17.334 27.554,17.334
  Keep-Out Layer region: 41.815,31.8 43.75,31.8 43.75,17.327 41.815,17.327
  Keep-Out Layer region: -1.002,31.8 1,31.8 1,17.328 -1.002,17.328
  Keep-Out Layer region: 56.056,31.8 58,31.8 58,17.317 56.056,17.317
  Keep-Out Layer region: -1,32.8 3.305,32.8 3.305,31.812 -1,31.812
  Keep-Out Layer region: 53.789,32.8 58,32.8 58,31.855 53.789,31.855
  Keep-Out Layer region: 11.205,32.8 17.31,32.8 17.31,31.843 11.205,31.843
  Keep-Out Layer region: 25.485,32.8 31.56,32.8 31.56,31.857 25.485,31.857
  Keep-Out Layer region: 39.745,32.8 45.81,32.8 45.81,31.844 39.745,31.844
  Keep-Out Layer region: -1.001,17.3 58,17.3 58,-9.514 -1.001,-9.514
  Keep-Out Layer region: 13.255,31.8 15.25,31.8 15.25,17.306 13.255,17.306
  Keep-Out Layer region: 27.544,31.8 29.5,31.8 29.5,17.328 27.544,17.328
  Keep-Out Layer region: 41.817,31.8 43.75,31.8 43.75,17.328 41.817,17.328
  Keep-Out Layer region: -1.002,31.8 1,31.8 1,17.334 -1.002,17.334
  Keep-Out Layer region: 56.018,31.8 58,31.8 58,17.305 56.018,17.305
  Keep-Out Layer region: -1.001,32.8 3.305,32.8 3.305,31.833 -1.001,31.833
  Keep-Out Layer region: 53.775,32.8 58,32.8 58,31.848 53.775,31.848
  Keep-Out Layer region: 11.207,32.8 17.31,32.8 17.31,31.849 11.207,31.849
  Keep-Out Layer region: 25.472,32.8 31.56,32.8 31.56,31.84 25.472,31.84
  Keep-Out Layer region: 39.72,32.8 45.81,32.8 45.81,31.824 39.72,31.824
  Keep-Out Layer region: -1.002,17.3 58,17.3 58,-9.517 -1.002,-9.517
  Keep-Out Layer region: 13.269,31.8 15.25,31.8 15.25,17.324 13.269,17.324
  Keep-Out Layer region: 27.554,31.8 29.5,31.8 29.5,17.334 27.554,17.334
  Keep-Out Layer region: 41.815,31.8 43.75,31.8 43.75,17.327 41.815,17.327
  Keep-Out Layer region: -1.002,31.8 1,31.8 1,17.328 -1.002,17.328
  Keep-Out Layer region: 56.056,31.8 58,31.8 58,17.317 56.056,17.317
  Keep-Out Layer region: -1,32.8 3.305,32.8 3.305,31.812 -1,31.812
  Keep-Out Layer region: 53.789,32.8 58,32.8 58,31.855 53.789,31.855
  Keep-Out Layer region: 11.205,32.8 17.31,32.8 17.31,31.843 11.205,31.843
  Keep-Out Layer region: 25.485,32.8 31.56,32.8 31.56,31.857 25.485,31.857
  Keep-Out Layer region: 39.745,32.8 45.81,32.8 45.81,31.844 39.745,31.844
  silkscreen extent 0,-9.5 57.25,32.57, body extent -0.97,-16.49 58.08,32.49, height 10.62
79523141 [mm] "Battery Holder, Battery Type: 2016,2020,2025,2032"
  rect 5.2x5.2 smd: 1(-12.95,0) 1(12.95,0)
  rect 4x4 smd: 2(0,0)
  silkscreen extent -10.55,-10.5 10.55,9.3, body extent -15.25,-10.5 15.25,9.3, height 4
7499511440 [mm] "LAN Transformer, body 33.02x17mm"
  rect 1.4x1.4 hole 0.89: 1(5.075,9.63)
  round 1.4 hole 0.89: 2(3.045,9.63) 3(1.015,9.63) 4(-1.015,9.63) 5(-3.045,9.63) 6(-5.075,9.63) 7(6.09,12.17) 8(4.06,12.17) 9(2.03,12.17) 10(-2.03,12.17) 11(-4.06,12.17) 12(-6.09,12.17)
  oval 1.4x1.25 hole 0.89: 13(5.59,2.51) 14(-5.59,2.51) 15(5.59,1.05) 16(-5.59,1.05)
  round 1.52 hole 1.02: 17(6.095,14.71) 18(3.555,14.71) 19(-3.555,14.71) 20(-6.095,14.71)
  round 2.8 hole 2.8 unplated: MH1(-6.35,-5.61) MH2(6.35,-5.61)
  round 2.4 hole 1.57: S1(-8.065,-8.79) S2(8.065,-8.79)
  silkscreen extent -10.72,-16.51 10.72,16.51, body extent -10.8,-16.51 10.8,16.51, height 16.21
430181038816 [mm] "Tact Switch, SMD, body 4.5x4.5mm"
  rect 2x1.4 smd: 1(-3.5,1.5) 2(3.5,1.5) 3(-3.5,-1.5) 4(3.5,-1.5)
  silkscreen extent -2.25,-2.25 2.25,2.25, body extent -3.75,-2.25 3.75,2.25, height 3.8
614105150721 [mm] "WR-COM_USB_Micro Type B_Vertical_THT Micro Type B Vertical THT"
  round 0.94 hole 0.44: 1(-1.3,0) 2(-0.65,-1) 3(0,0) 4(0.65,-1) 5(1.3,0)
  oval 0.85x1.5 hole 0.35 slot 1 at 90 deg: Z1(-3.575,-0.22) Z2(3.575,-0.22)
  silkscreen extent -3.7,-1.3 3.7,1.05, body extent -3.99,-1.57 4.01,1.33, height 5.62
692121130100 [mm] "Receptacle TH Reverse Offset 0.14mm"
  rect 1.2x1.2 hole 0.7: 1(-4.35,2.43)
  round 1.2 hole 0.7: 2(-6.85,2.43) 3(-8.85,2.43) 4(-11.35,2.43) 5(-11.85,0.93) 6(-9.85,0.93) 7(-7.85,0.93) 8(-5.85,0.93) 9(-3.85,0.93)
  oval 1.4x2.8 hole 0.8 slot 2.3 at 90 deg: Z1(-15.7,-6.8) Z1(-15.7,0) Z1(0,-6.8) Z1(0,0)
  Keep-Out Layer board cut-out: -14.6,-0.2 -1.1,-0.2 -1.1,-12.15 -14.6,-12.15
  Mechanical 1 keep-out lines w0.127: -14.6,-12.15 -1.1,-12.15 -1.1,-0.2 -14.6,-0.2 -14.6,-12.15
  silkscreen extent -15.16,-12.15 -0.53,3.72, body extent -15.85,-12.15 0.15,3.72, height 3.71
693071020811 [mm] "Micro SD Card Connector Push & Push - with Card Detection - 8 Pins"
  rect 0.7x1.9 smd: 1(2.25,7.75) 2(1.15,7.75) 3(0.05,7.75) 4(-1.05,7.75) 5(-2.15,7.75) 6(-3.25,7.75) 7(-4.35,7.75) 8(-5.45,7.75) 9(-6.55,7.75)
  rect 1.7x1.8 smd: 10(-8.1,6.7) 11(7.4,6.7)
  rect 1.4x2.6 smd: 12(-7.85,-2.9) 13(7.85,-2.9)
  round 0.9 hole 0.9 unplated: MH1(-4.95,-3.3)
  oval 1.7x0.9 hole 0.9 slot 1.7 at 0 deg unplated: MH2(3.05,-3.3)
  silkscreen extent -7.35,-7.25 7.35,7.25, body extent -8.2,-7.3 8.2,7.73, height 1.85
744373560068 [mm] "Precision Wire Wound Inductor, 2-Leads, Body 9,70x8,50mm, IPC High Density"
  rect 2.52x5.33 smd: 1(-3.62,0) 2(3.62,0)
  silkscreen extent -5.1,-4.25 5.1,4.25, body extent -4.95,-4.25 4.95,4.25, height 3.1
ADP1752_1753/ADP1740_1741 [mm] "16-Lead Lead Frame Chip Scale Package [LFCSP_WQ]  4 mm × 4 mm Body, Very Very Thin Quad  (CP-16-23)"
  rect 0.6x0.3 smd: 1(-1.675,0.975) 2(-1.675,0.325) 3(-1.675,-0.325) 4(-1.675,-0.975) 9(1.675,-0.975) 10(1.675,-0.325) 11(1.675,0.325) 12(1.675,0.975)
  rect 0.3x0.6 smd: 5(-0.975,-1.675) 6(-0.325,-1.675) 7(0.325,-1.675) 8(0.975,-1.675) 13(0.975,1.675) 14(0.325,1.675) 15(-0.325,1.675) 16(-0.975,1.675)
  rect 2.1x2.1 smd: 17(0,0)
  silkscreen extent -2.82,-2.05 2.05,2.05, body extent -2.05,-2.05 2.05,2.05, height 0.8
ADP1850 [mm] "32-Lead Lead Frame Chip Scale Package [LFCSP] 5 mm × 5 mm Body and 0.75 mm Package Height (CP-32-12)"
  rect 0.4x0.25 smd: 1(-2.25,1.75) 2(-2.25,1.25) 3(-2.25,0.75) 4(-2.25,0.25) 5(-2.25,-0.25) 6(-2.25,-0.75) 7(-2.25,-1.25) 8(-2.25,-1.75) 17(2.25,-1.75) 18(2.25,-1.25) 19(2.25,-0.75) 20(2.25,-0.25) 21(2.25,0.25) 22(2.25,0.75) 23(2.25,1.25) 24(2.25,1.75)
  rect 0.25x0.4 smd: 9(-1.75,-2.25) 10(-1.25,-2.25) 11(-0.75,-2.25) 12(-0.25,-2.25) 13(0.25,-2.25) 14(0.75,-2.25) 15(1.25,-2.25) 16(1.75,-2.25) 25(1.75,2.25) 26(1.25,2.25) 27(0.75,2.25) 28(0.25,2.25) 29(-0.25,2.25) 30(-0.75,2.25) 31(-1.25,2.25) 32(-1.75,2.25)
  rect 3.6x3.6 smd paste-3: 33(0,0)
  silkscreen extent -3.27,-2.5 2.5,2.5, body extent -2.5,-2.5 2.5,2.5, height 0.8
BAS40-04-TP [mm] "SOT23, 3-Leads, Body 2,92x2,37mm, Pitch 0,90mm, IPC High Density"
  rect 0.9x0.8 smd: 1(-1,0.95) 2(-1,-0.95) 3(1,0)
  silkscreen extent -1.12,-1.5 0.7,1.98, body extent -1.32,-1.52 1.32,1.52, height 1.12
BAT54T1G [mm] "SOD-123  CASE 425-04"
  rect 0.91x1.22 smd: 1(-1.635,0) 2(1.635,0)
  silkscreen extent -2.04,0.86 -1.94,0.96, body extent -1.86,-0.9 1.86,0.9, height 1.35
Battery [mm]
  rect 0.5x1.8 smd: 1(1,0) 2(-1,0)
  Keep-Out Layer circle w0.254: c0,6.858 r4.906
  silkscreen extent -4.86,-2.5 4.91,11.73
BSC030N03LS [mm] "PG-TDSON-8-1"
  rect 0.85x0.6 smd: 1(-2.9,1.905) 2(-2.9,0.635) 3(-2.9,-0.635) 4(-2.9,-1.905)
  rect 0.8x0.6 smd: 5(2.925,-1.905) 6(2.925,-0.635) 7(2.925,0.635) 8(2.925,1.905)
  rect 3.762x4.41 smd paste-2: ""(0.662,0)
  silkscreen extent -3.77,-2.89 3.32,2.94, body extent -3.32,-2.75 3.32,2.75, height 1.1
BSC080N03LS [mm] "PG-TDSON-8-5"
  rect 0.85x0.6 smd: 1(-2.9,1.905) 2(-2.9,0.635) 3(-2.9,-0.635) 4(-2.9,-1.905)
  rect 0.8x0.6 smd: 5(2.925,-1.905) 6(2.925,-0.635) 7(2.925,0.635) 8(2.925,1.905)
  rect 3.762x4.41 smd paste-2: ""(0.662,0)
  silkscreen extent -3.77,-2.89 3.32,2.94, body extent -3.32,-2.75 3.32,2.75, height 1.1
"CAP 0201/0603 RF" [mm] "Chip Capacitor, 2-Leads, Body 0.60x0.30mm, IPC High Density"
  rect 0.3x0.32 smd: 1(-0.26,0) 2(0.26,0)
  silkscreen extent -0.57,-0.33 0.58,0.33, body extent -0.3,-0.15 0.3,0.15, height 0.3
"CAP 0402/1005 RF" [mm] "Chip Capacitor, 2-Leads, Body 1.02x0.51mm, IPC High Density"
  rect 0.55x0.54 smd: 1(-0.39,0) 2(0.39,0)
  silkscreen extent -0.88,-0.45 0.87,0.45, body extent -0.5,-0.26 0.5,0.26, height 0.52
"CAP 0603/1608 RF" [mm] "Chip Capacitor, 2-Leads, Body 1.60x0.80mm, IPC High Density"
  rect 0.8x0.9 smd: 1(-0.625,0) 2(0.625,0)
  silkscreen extent -1.2,-0.62 1.2,0.62, body extent -0.8,-0.41 0.8,0.41, height 0.82
"CAP 0805/2012 RF" [mm] "Chip Capacitor, 2-Leads, Body 2.00x1.20mm, IPC High Density"
  rect 1.1x1.3 smd: 1(-0.7,0) 2(0.7,0)
  silkscreen extent -1.43,-0.82 1.43,0.82, body extent -1,-0.64 1,0.64, height 1.26
"CAP 1206/3216" [mm] "Chip Capacitor, 2-Leads, Body 3.25x1.60mm, IPC Medium Density"
  rect 1.3x1.8 smd: 1(-1.45,0) 2(1.45,0)
  silkscreen extent -2.38,-1.13 2.38,1.13, body extent -1.6,-0.81 1.6,0.81, height 1.62
"CAP 1206/3216 - 0.8MM" [mm] "Chip Capacitor, 2-Leads, Body 3.25x1.60mm, IPC Medium Density"
  rect 1.3x1.8 smd: 1(-1.45,0) 2(1.45,0)
  silkscreen extent -2.37,-1.13 2.38,1.13, body extent -1.6,-0.8 1.6,0.8, height 0.8
"CAP 1210/3225 - 1MM" [mm] "Chip Capacitor, 2-Leads, Body 3.20x2.50mm, IPC Medium Density"
  rect 1.3x2.7 smd: 1(-1.4,0) 2(1.4,0)
  silkscreen extent -2.38,-1.62 2.38,1.62, body extent -1.6,-1.25 1.6,1.25, height 1
"CAP POL 2917/7343" [mm] "Molded Capacitor, 2-Leads, Body 7.30x4.30mm, IPC Medium Density"
  rect 2.55x2.45 smd: 1(-3.025,0) 2(3.025,0)
  silkscreen extent -4.57,-2.3 3.8,2.3, body extent -3.65,-2.15 3.65,2.15, height 4.1
"CASE 457" [mil] "CASE 457-04, MBRM140T1G"
  rect 105.12x100 smd: 1(-65.06,0)
  rect 30x50 smd: 2(27.5,0)
  silkscreen extent -126,-61 -122,-57, body extent -118,-52 27,53, height 43
CDCM1802RGTT [mm] "PQFN, 16-Leads, Body 3,00x3,00mm, Pitch 0,50mm, Thermal Pad 1,45x1,45mm, IPC High Density"
  rect 0.6x0.24 smd: 1(-1.4,0.75) 2(-1.4,0.25) 3(-1.4,-0.25) 4(-1.4,-0.75) 9(1.4,-0.75) 10(1.4,-0.25) 11(1.4,0.25) 12(1.4,0.75)
  rect 0.24x0.6 smd: 5(-0.75,-1.4) 6(-0.25,-1.4) 7(0.25,-1.4) 8(0.75,-1.4) 13(0.75,1.4) 14(0.25,1.4) 15(-0.25,1.4) 16(-0.75,1.4)
  rect 1.45x1.45 smd paste-0.11: 17(0,0)
  silkscreen extent -2.32,-1.55 1.55,1.55, body extent -1.55,-1.55 1.55,1.55, height 1
CDRH4D28NP [mm] "Precision Wire Wound Inductor, 2-Leads, Body 4,70x4,70mm, IPC High Density"
  rect 1.9x5.3 smd: 1(-1.7,0) 2(1.7,0)
  body extent -2.45,-2.35 2.45,2.35, height 3.1
CDRH5D28 [mm] "CDRH5D28 , Precision Wire Wound Inductor, 2-Leads, Body 6,00x6,00mm, IPC High Density"
  rect 2.15x6.3 smd: 1(-2.075,0) 2(2.075,0)
  silkscreen extent -0.45,-3 0.45,3, body extent -3.1,-3.15 3.1,3.15, height 3.1
Crystal [mm]
  round 1.2 hole 0.6: 1(0,0) 2(4.88,0)
  silkscreen extent -3.81,-1.91 8.69,1.91
CVCO55CW [mm]
  rect 1.32x1.32 smd: 1(0,9.779) 2(0,7.239) 3(0,4.699) 4(0,2.159) 5(2.667,0) 6(5.207,0) 7(7.747,0) 8(10.287,0) 9(12.7,3.048) 10(12.7,5.588) 11(12.7,8.128) 12(12.7,10.668) 13(10.541,12.7) 14(8.001,12.7) 15(5.461,12.7) 16(2.921,12.7)
  silkscreen extent -1.95,0 12.7,12.7
DAC1220 [mm]
  rect 1.6x0.41 smd: 1(-2.667,2.235) 2(-2.667,1.6) 3(-2.667,0.965) 4(-2.667,0.33) 5(-2.667,-0.305) 6(-2.667,-0.94) 7(-2.667,-1.575) 8(-2.667,-2.21) 9(2.667,-2.21) 10(2.667,-1.575) 11(2.667,-0.94) 12(2.667,-0.305) 13(2.667,0.33) 14(2.667,0.965) 15(2.667,1.6) 16(2.667,2.235)
  silkscreen extent -1.55,-2.49 1.55,2.49
"DF005S2 - DF10S2" [mm] "4-LEAD, SDIP, 6.5 MM WIDE"
  rect 1.5x1.3 smd: 1(-4.45,2.55) 2(-4.45,-2.55) 3(4.45,-2.55) 4(4.45,2.55)
  silkscreen extent -4.57,-4.25 2.85,4.25, body extent -4.92,-4.25 4.92,4.25, height 2.6
DFLS1100 [mm] "Molded Diode, 2-Leads, Body 2,80x1,78mm, IPC High Density"
  rect 1.05x1.5 smd: 1(-0.85,0)
  rect 2.4x1.5 smd: 2(1.524,0)
  silkscreen extent -0.81,-1.02 1.27,1.07, body extent -1.02,-0.96 2.42,0.96, height 1
DP83867E [mm] "VQFN, 48-Leads, Body 7,00x7,00mm, Pitch 0,50mm, Thermal Pad 4,10x4,10mm, IPC High Density"
  oval 0.6x0.24 smd: 1(-3.4,2.75) 2(-3.4,2.25) 3(-3.4,1.75) 4(-3.4,1.25) 5(-3.4,0.75) 6(-3.4,0.25) 7(-3.4,-0.25) 8(-3.4,-0.75) 9(-3.4,-1.25) 10(-3.4,-1.75) 11(-3.4,-2.25) 12(-3.4,-2.75) 25(3.4,-2.75) 26(3.4,-2.25) 27(3.4,-1.75) 28(3.4,-1.25) 29(3.4,-0.75) 30(3.4,-0.25) 31(3.4,0.25) 32(3.4,0.75) 33(3.4,1.25) 34(3.4,1.75) 35(3.4,2.25) 36(3.4,2.75)
  oval 0.24x0.6 smd: 13(-2.75,-3.4) 14(-2.25,-3.4) 15(-1.75,-3.4) 16(-1.25,-3.4) 17(-0.75,-3.4) 18(-0.25,-3.4) 19(0.25,-3.4) 20(0.75,-3.4) 21(1.25,-3.4) 22(1.75,-3.4) 23(2.25,-3.4) 24(2.75,-3.4) 37(2.75,3.4) 38(2.25,3.4) 39(1.75,3.4) 40(1.25,3.4) 41(0.75,3.4) 42(0.25,3.4) 43(-0.25,3.4) 44(-0.75,3.4) 45(-1.25,3.4) 46(-1.75,3.4) 47(-2.25,3.4) 48(-2.75,3.4)
  rect 4.1x4.1 smd paste-2.5: 49(0,0)
  silkscreen extent -4.35,-3.57 3.57,3.58, body extent -3.57,-3.58 3.58,3.57, height 1
ECS-120-8-33-RWY-TR [mm] "Ceramic package 4-Leads, Body 2,50x3,20mm, Pitch 1,80mm, IPC High Density"
  rect 1.3x1.1 smd: 1(-1.15,-0.9) 2(1.15,-0.9) 3(1.15,0.9) 4(-1.15,0.9)
  silkscreen extent -2.1,-1.55 -2,-1.45, body extent -1.6,-1.25 1.6,1.25, height 0.8
ESDCAN02-2BWY [mm] "SOT23, 3-Leads, Body 2,00x2,10mm, Pitch 0,65mm, IPC High Density"
  rect 0.7x0.42 smd: 1(-1,0.65) 2(-1,-0.65) 3(1,0)
  silkscreen extent -1.12,-1.1 0.67,1.53, body extent -1.3,-1.1 1.3,1.1, height 1.1
FA-23825.0000MB-C3 [mm] "3.2 x 2.5 x 0.7 mm -- FA-238V / FA-238"
  rect 0.8x0.9 smd: 1(-0.75,1.05) 2(-0.75,-1.05) 3(0.75,-1.05) 4(0.75,1.05)
  silkscreen extent -1.81,1.66 -1.71,1.76, body extent -1.25,-1.6 1.25,1.6, height 0.7